# Altium PCB PowerCutMonitor-v1.0.PcbDoc (part 1 of 2)
Units mil, origin at the board's own origin, x right, y up, seen from the top; angles counter-clockwise.
Board outline 3267.72 x 1141.73 mil, 2 copper layers (Top Layer, Bottom Layer), stack 61.811 mil thick; 45 components, 28 nets, 151 pads, 51 vias.
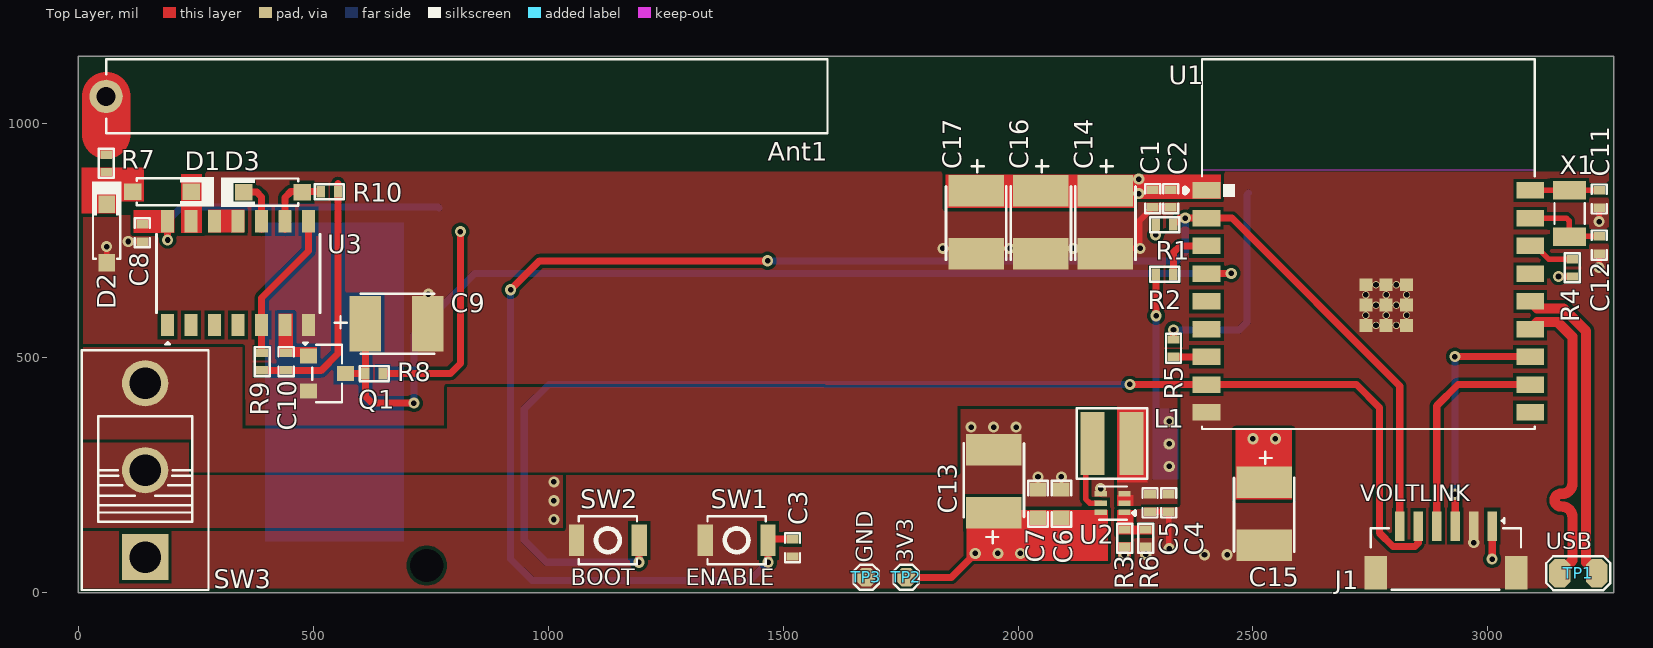
[diagram p0: Top Layer view]
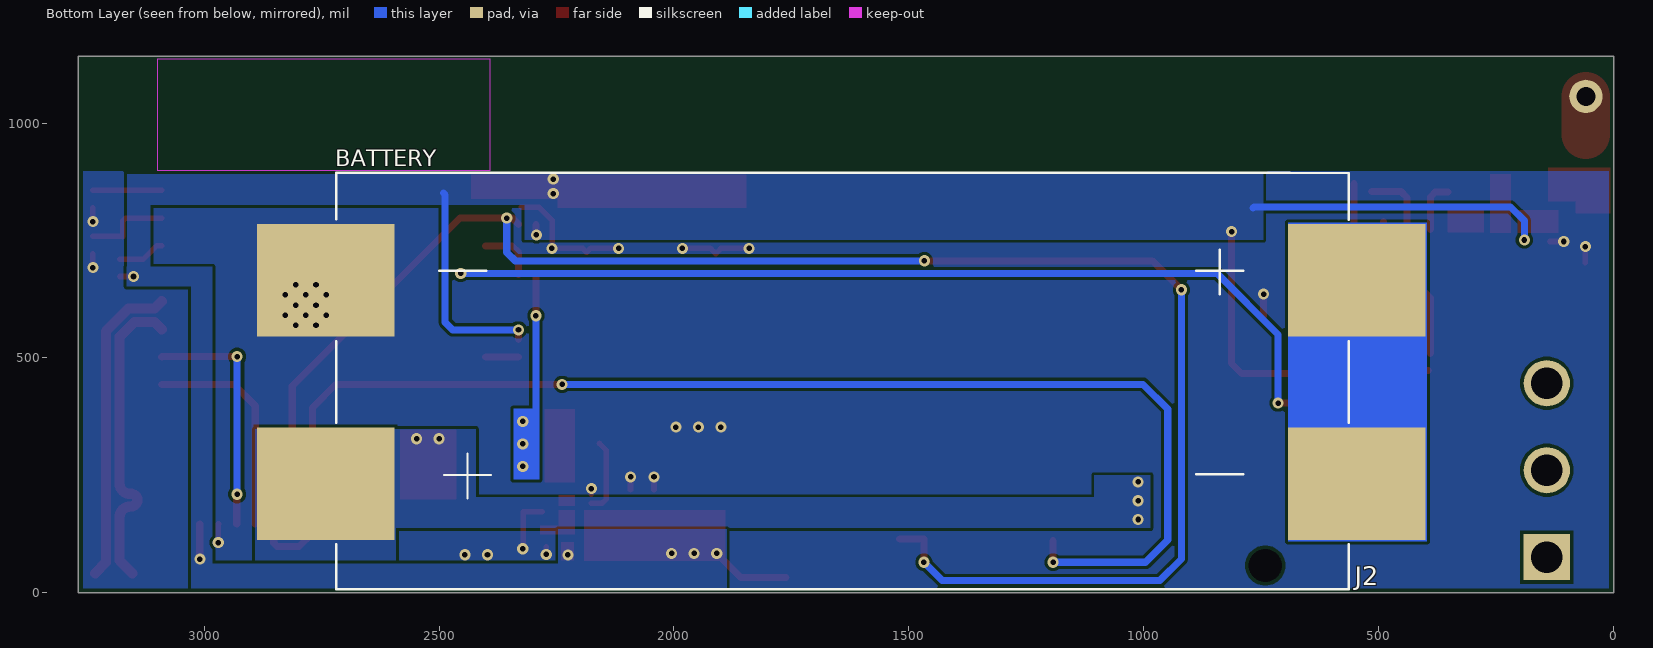
[diagram p1: Bottom Layer view, seen from below]
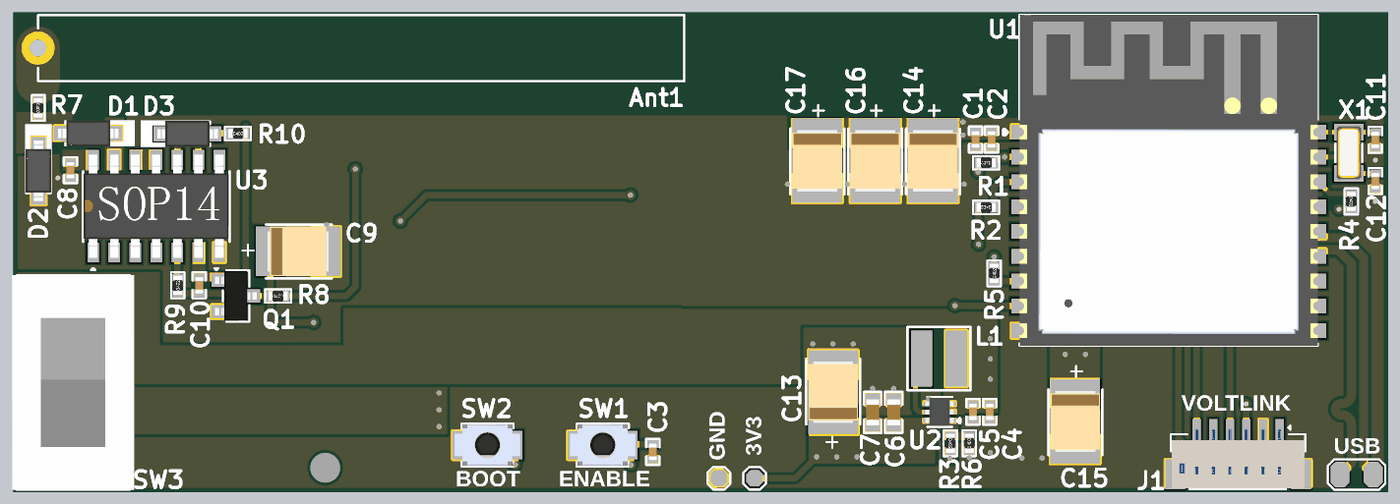
[diagram p2: 3D render of the assembled board from above, using the file's embedded part models]

## Layer stack, top to bottom
Top Solder: solder mask 0.394, Solder Resist, Dk 3.5
Top Layer: signal copper 1.378
Dielectric 1: dielectric 59.055, FR-4, Dk 4.8
Bottom Layer: signal copper 1.378
Bottom Solder: solder mask 0.394, Solder Resist, Dk 3.5

## Board outline
0,0 3267.72,0 3267.72,1141.73 0,1141.73

## Design rules (kind name [scope] priority, off if disabled: settings)
BoardOutlineClearance [All] p1: gap=0 ignorepadtopadclearanceinfootprint=FALSE except(10: Poly-OutlineEdge)
Clearance [All] p1: gap=7 ignorepadtopadclearanceinfootprint=FALSE except(0: Arc-Hole Track-Hole SMDPad-Hole THPad-Hole Via-Hole Fill-Hole Poly-Hole Region-Hole Text-Hole; 4: Arc-SMDPad Track-SMDPad SMDPad-SMDPad)
DiffPairsRouting [InDifferentialPair('USB_D')] p1: maxlimit=7 minlimit=7 mostfreqgap=7 toplayer_minwidth=22 toplayer_maxwidth=22 toplayer_prefwidth=22 bottomlayer_minwidth=22 bottomlayer_maxwidth=22 bottomlayer_prefwidth=22 impedanceprofiledriven=TRUE impedanceprofileid={5CDDB4C1-96F4-4CBD-ACC2-1FC4F32C532A} impedanceprofilevalue=90.000000 maxuncoupledlength=500
HoleSize [All] p1: absolutevalues=TRUE maxlimit=1000 minlimit=1 maxpercent=80.000 minpercent=20.000
HoleToHoleClearance [All] p1: gap=0 allowstackedmicrovias=TRUE
MinimumSolderMaskSliver [All] p1: minsoldermaskwidth=0
PolygonConnect [All] p1: connectstyle=Direct reliefconductorwidth=10 reliefentries=4 polygonreliefangle="90 Angle" airgapwidth=10
RoutingVias [All] p1: holewidth=11.81 width=23.62 viastyle="Through Hole" minholewidth=11.81 minwidth=23.62 maxholewidth=11.81 maxwidth=23.62
SilkToSilkClearance [All] p1: silktosilkclearance=0
SilkToSolderMaskClearance [IsPad] p1: minsilkscreentomaskgap=0 clearancetoexposedcopper=TRUE
SolderMaskExpansion [All] p1: expansion=4 istentingtop=FALSE
Width Width_RF [InNet('NetAnt1_1')] p1: maxlimit=103.77 minlimit=103.77 preferedwidth=103.77 impedanceprofiledriven=TRUE impedanceprofileid={25470196-0FB0-4DC4-8176-56BB9425A2A2} impedanceprofilevalue=50.000000 minimp=50.000000 maximp=50.000000 favimp=50.000000
Width [All] p2: maxlimit=100 minlimit=10 preferedwidth=22
24 further rules are at their usual default settings.

## Classes and differential pairs
net class USB_LINES: USB_D_N USB_D_P
differential pair USB_D: +USB_D_P -USB_D_N

## Components (designator, comment, footprint, x,y, rotation, side; value= is the part's Value field where it differs from the comment)
Ant1 "BW315SNX39-6W3" BW315SNX39-6W3 59,1056.73 r90 top
C1 "100nF" cap-0402 2287,839.23 r90 top
C2 "10uF" Cap-0402 2325,839.23 r90 top
C3 "1uF" Cap-0402 1520,95.73 r90 top
C4 "10uF" Cap-0402 2321,191.23 r90 top
C5 "10uF" Cap-0402 2281,191.23 r90 top
C6 "22uF" Cap-0603 2092.5,189.73 r270 top
C7 "22uF" Cap-0603 2042.5,189.73 r270 top
C8 "100nF" cap-0402 136,766.23 r90 top
C9 "33uF" Case-B 677,572.73 r0 top
C10 "2.2nF" Cap-0402 442,492.23 r90 top
C11 "15pF" Cap-0402 3237,838.23 r90 top
C12 "15pF" Cap-0402 3237,740.23 r90 top
C13 "100uF" Case-B 1948.5,237.66 r90 top
C14 "100uF" Case-B 2186,788.8 r270 top
C15 "100uF" Case-B 2524,168.07 r270 top
C16 "100uF" Case-B 2048.5,788.8 r270 top
C17 "100uF" Case-B 1911,788.8 r270 top
D1 "1N4148W-7-F" SOD-123 178,853.73 r0 top value=2pF
D2 "1N4148W-7-F" SOD-123 60,764.72 r90 top value=2pF
D3 "1N4148W-7-F" SOD-123 414.01,852.73 r180 top value=2pF
J1 "Voltlink Target" "Voltlink Target" 2911,92.37 r180 top
J2 "BH-AAA-B5AK001" BH-AAA-B5AK001 1644,448.73 r0 bottom
L1 "0.47uH" SPM3015-R47N 2200,317.73 r0 top
Q1 "BC847C,215" SOT-23 529,466.73 r270 top
R1 "10K" Res-0402 2312,783.73 r180 top
R2 "1K" Res-0402 2312,677.73 r180 top
R3 "453K" Res-0402 2227,116.23 r270 top
R4 "10K" Res-0402 3180,691.73 r270 top
R5 "10K" Res-0402 2331.04,520.69 r90 top
R6 "100K" Res-0402 2272,116.23 r90 top
R7 "1M" Res-0402 59,914.23 r270 top value=1MR
R8 "100K" Res-0402 629.5,466.73 r0 top
R9 "220K" Res-0402 391,492.23 r90 top
R10 "560K" Res-0402 534.02,853.73 r0 top
SW1 "B3U-1000P" B3U-1000P 1401.07,111.73 r180 top
SW2 "B3U-1000P" B3U-1000P 1127,111.73 r180 top
SW3 "SS-12D10L9" SS-12D10L9 142,261 r90 top
TP1 "2 Test Pad" "2 Test Pad" 3153.26,41.73 r0 top
TP2 "TEST POINT 0.5mm Dia" "Test-point - 0.5mm" 1762,33 r180 top
TP3 "TEST POINT 0.5mm Dia" "Test-point - 0.5mm" 1677,33 r180 top
U1 "ESP32-C3-WROOM-02-N4" ESP32-C3-WROOM-02-N4 2401.41,856.52 r0 top
U2 "TPS61023DRLR" SOT-563 2201.5,190.73 r180 top
U3 "CD4069" SOP-14 340,680.5 r90 top
X1 "Q13FC13500004" SMD3215-2P 3174,807.52 r270 top

## Footprints (in the part's own frame and the unit in brackets; to place one, negate y for a bottom-side part, rotate by r counter-clockwise, add the part's x,y. Pads: shape width x height; smd on the part's side, far side on the other; paste and mask are expansions set on the pad)
"2 Test Pad" [mil]
  oct 45x60 smd: 1(0,0) 2(78.74,0)
  silkscreen extent -29,-36 108,36
B3U-1000P [mm] "SWITCH TACTILE SPST-NO 0.05A 12V"
  rect 0.82x1.72 smd: 1(-1.7,0) 2(1.7,0)
  silkscreen extent -1.57,-1.3 1.57,1.3, body extent -2,-1.26 2,1.24, height 1.6
BH-AAA-B5AK001 [mm]
  rect 7.45x6.1 smd: 1(27.875,5.5) 2(-27.875,5.5) 3(-27.875,-5.5) 4(27.875,-5.5)
  round 0 hole 1.8 unplated: S39(-22.925,9.925)
  silkscreen extent -27.43,-11.31 27.31,11.2, body extent -31.1,-11.2 31.1,11.2, height 11.4
BW315SNX39-6W3 [mm]
  round 1.8 hole 1.02: 1(0,0)
  silkscreen extent -2,-39 2,0
cap-0402 [mil]
  rect 18x25 smd mask+2.36: 1(-18.5,0) 2(18.5,0)
  silkscreen extent -31,-16 31,16, body extent -20,-10 20,10, height 19
Cap-0402 [mil]
  rect 18x25 smd mask+2.36: 1(-18.5,0) 2(18.5,0)
  silkscreen extent -31,-16 31,16, body extent -20,-10 20,10, height 19
Cap-0603 [mil]
  rect 30x35 smd mask+2.36: 1(-30,0) 2(30,0)
  silkscreen extent -49,-21 49,21, body extent -32,-16 31,16, height 34
Case-B [mm]
  rect 1.7x3 smd paste+0: 1(-1.7,0) 2(1.7,0)
  silkscreen extent -3.35,-1.63 2.03,1.63, body extent -1.85,-1.5 1.85,1.5, height 2.16
ESP32-C3-WROOM-02-N4 [mm]
  rect 1.5x0.9 smd: 1(0,0) 2(0,-1.5) 3(0,-3) 4(0,-4.5) 5(0,-6) 6(0,-7.5) 7(0,-9) 8(0,-10.5) 9(0,-12) 10(17.5,-12) 11(17.5,-10.5) 12(17.5,-9) 13(17.5,-7.5) 14(17.5,-6) 15(17.5,-4.5) 16(17.5,-3) 17(17.5,-1.5) 18(17.5,0)
  rect 0.7x0.7 smd: 19(8.61,-5.1) 20(9.71,-5.1) 21(10.81,-5.1) 22(8.61,-6.2) 23(9.71,-6.2) 24(10.81,-6.2) 25(8.61,-7.3) 26(9.71,-7.3) 27(10.81,-7.3)
  round 0.4 hole 0.3 mask+0: 28(9.16,-5.1) 29(10.26,-5.1) 30(8.61,-5.65) 31(9.71,-5.65) 32(10.81,-5.65) 33(9.16,-6.2) 34(10.26,-6.2) 35(8.61,-6.75) 36(9.71,-6.75) 37(10.81,-6.75) 38(9.16,-7.3) 39(10.26,-7.3)
  Keep-Out Layer region: 17.75,1.1 -0.25,1.1 -0.25,7.1 17.75,7.1
  silkscreen extent -1.17,-12.9 17.75,7.1, body extent -0.25,-12.9 17.75,7.1, height 3.35
Res-0402 [mil]
  rect 18x25 smd mask+2.17: 1(-18.5,0) 2(18.5,0)
  silkscreen extent -32,-17 32,16, body extent -23,-11 23,11, height 16
SMD3215-2P [mm]
  rect 1x1.8 smd: 1(-1.25,0) 2(1.25,0)
  silkscreen extent -0.56,-0.81 0.56,0.81, body extent -1.6,-0.75 1.6,0.75, height 0.8
SOD-123 [mm]
  rect 0.95x0.9 smd: 1(-1.575,0) 2(1.575,0)
  silkscreen extent -1.37,-0.8 2.82,0.8, body extent -1.82,-0.78 1.83,0.78, height 1.5
SOP-14 [mm]
  rect 1.2x0.7 smd: 1(-2.8,3.81) 2(-2.8,2.54) 3(-2.8,1.27) 4(-2.8,0) 5(-2.8,-1.27) 6(-2.8,-2.54) 7(-2.8,-3.81) 8(2.8,-3.81) 9(2.8,-2.54) 10(2.8,-1.27) 11(2.8,0) 12(2.8,1.27) 13(2.8,2.54) 14(2.8,3.81)
  silkscreen extent -3.86,-4.42 2.1,4.42, body extent -3.12,-4.38 3.12,4.38, height 1.39
SOT-23 [mm] "TRANS NPN 40V 0.6A SOT23"
  rect 0.82x0.92 smd: 1(-0.95,-1) 2(0.95,-1) 3(0,1)
  silkscreen extent -1.68,-1.3 1.55,0.81, body extent -1.5,-1.25 1.5,1.25, height 1.05
SOT-563 [mm]
  rect 0.67x0.3 smd mask+0.07: 1(-0.638,0.5) 2(-0.638,0) 3(-0.638,-0.5) 4(0.638,-0.5) 5(0.638,0) 6(0.638,0.5)
  silkscreen extent -1.22,-0.9 0.74,0.9, body extent -0.85,-0.85 0.85,0.85, height 0.61
SPM3015-R47N [mm]
  rect 1.3x3.4 smd: 1(1.05,0) 2(-1.05,0)
  silkscreen extent -1.91,-1.91 1.9,1.91
SS-12D10L9 [mm]
  rect 2.5x2.5 hole 1.7 paste-2539.97 mask+0.051: 1(-4.7,0)
  round 2.5 hole 1.7 paste-2539.97 mask+0.051: 2(0,0) 3(4.7,0)
  silkscreen extent -6.48,-3.43 6.48,3.43, body extent -6.5,-3.7 6.5,3.7, height 16
"Test-point - 0.5mm" [mm]
  oct 1x1 smd: 1(0,0)
  silkscreen extent -0.68,-0.68 0.68,0.68
"Voltlink Target" [mm]
  rect 0.5x1.6 smd: 1(-2.5,-1.262) 2(-1.5,-1.262) 3(-0.5,-1.262) 4(0.5,-1.262) 5(1.5,-1.262) 6(2.5,-1.262)
  rect 1.2x1.8 smd: MP1(-3.8,1.262) MP2(3.8,1.262)
  silkscreen extent -4.06,-1.68 4.06,2.17, body extent -4,-1.49 4,2.11, height 4.25

## Part data
Ant1: "1.8 3dBi Vertical 50W Antennas ROHS", LCSC Part Number=C496553, Manufacturer="BAT WIRELESS", Package=Custom, ComponentLink1Description=LCSC, ComponentLink1URL=https://www.lcsc.com/product-detail/Antennas_BAT-WIRELESS-BW315SNX39-6W3_C496553.html, Item Type=Antenna, Manufacturer Part Number=BW315SNX39-6W3
C1 C8: library part C1005X7R1H104KT000F, "CAP CER 0.1UF 50V X7R 0402", Dielectric=X7R, LCSC Part Number=C361198, Manufacturer=TDK, Tolerance=10%, Voltage=25V, Category="Ceramic Capacitors", ComponentLink1Description=LCSC, ComponentLink1URL=https://www.lcsc.com/product-detail/Multilayer-Ceramic-Capacitors-MLCC-SMD-SMT_TDK-C1005X7R1H104KT000F_C361198.html, Item Type=Capacitor, Manufacturer Part Number=C1005X7R1H104KT000F, RoHS=No, Supplier 1=Avnet, Supplier Part Number 1=C1005X7R1H104KT000F
C2 C4 C5: library part CC0402MRX5R6BB106, "CAP CER 10UF 10V X5R 0402", Case Code (Imperial)=0402, Case Code (Metric)=1005, LCSC Part Number=C962143, Manufacturer=Yageo, Max Operating Temperature=85°C, Min Operating Temperature=-55°C, Supplier Part Number 1=6097631, Tolerance=20%, Voltage Rating=10V, Capacitance=10uF, Case/Package=0402, Category="Ceramic Capacitors", ComponentLink1Description=http://www.yageo.com/documents/recent/UPY-GPHC_X5R_4V-to-50V_25.pdf?src-supplier=Digi-Key, ComponentLink1URL=http://www.yageo.com/documents/recent/UPY-GPHC_X5R_4V-to-50V_25.pdf?src-supplier=Digi-Key, Item Type=Capacitor, Manufacturer Part Number=CC0402MRX5R6BB106, Mount="Surface Mount", Packaging="Tape and Reel", Pricing 1="10000=0.02650, 20000=0.02590, 30000=0.02550, 40000=0.02530, 50000=0.02450 (USD)", RoHS=Yes, RoHS Compliant=Yes, Stock 1=80000, Supplier 1="Future Electronics"
C3: library part CC0402KRX5R7BB105, "CAP CER 1UF 16V X5R 0402", Case Code (Imperial)=0402, Case Code (Metric)=1005, Dielectric=X5R, LCSC Part Number=C325464, Manufacturer=Yageo, Max Operating Temperature=85°C, Min Operating Temperature=-55°C, Supplier Part Number 1=311-1691-6-ND, Tolerance=10%, Voltage Rating=16V, Capacitance=1uF, Case/Package=0402, ComponentLink1Description=http://www.yageo.com/documents/recent/UPY-GPHC_X5R_4V-to-50V_12.pdf?src-supplier=Avnet+Europe, ComponentLink1URL=http://www.yageo.com/documents/recent/UPY-GPHC_X5R_4V-to-50V_12.pdf?src-supplier=Avnet+Europe, Composition=Ceramic, Depth=0.5mm, Halogen Free="Halogen Free", Height=0.5mm, Item Type=Capacitor, Lead Free="Lead Free", Length=1mm, Manufacturer Part Number=CC0402KRX5R7BB105, Mount="Surface Mount", Packaging="Tape and Reel", Pricing 1="1=0.36, 10=0.252, 100=0.1512, 500=0.1134, 1000=0.09576, 2500=0.09072, 5000=0.08568 (USD)", Radiation Hardening=No, Stock 1=1405667, Supplier 1=Digi-Key, Termination=SMD/SMT, Thickness=0.022inch, Voltage Rating (DC)=16V, Weight=2.3E-05oz, Width=0.02inch
C6 C7: library part CC0603MRX5R5BB226, "CAP CER 22UF 6.3V X5R 0603", Case Code (Imperial)=0603, Case Code (Metric)=1608, Dielectric=X5R, LCSC Part Number=C109448, Manufacturer=Yageo, Max Operating Temperature=85°C, Min Operating Temperature=-55°C, Package Quantity=4000, Resistor Type=Ceramic, Supplier Part Number 1=603-CC603MRX5R5BB226, Tolerance=20%, Voltage Rating=6.3V, Capacitance=22uF, Case/Package=0603, Category="Ceramic Capacitors", ComponentLink1Description=http://www.mouser.com/ds/2/447/Yageo_UPY-GP_NP0_16V-to-50V_9-358835.pdf?src-supplier=Mouser, ComponentLink1URL=http://www.mouser.com/ds/2/447/Yageo_UPY-GP_NP0_16V-to-50V_9-358835.pdf?src-supplier=Mouser, ComponentLink2Description=http://www.yageo.com/documents/recent/UPY-GPHC_X5R_4V-to-50V_25.pdf?src-supplier=Digi-Key, ComponentLink2URL=http://www.yageo.com/documents/recent/UPY-GPHC_X5R_4V-to-50V_25.pdf?src-supplier=Digi-Key, Depth=0.8mm, Halogen Free="Halogen Free", Lead Free="Lead Free", Length=0.063inch, Manufacturer Part Number=CC0603MRX5R5BB226, Mount="Surface Mount", Packaging="Tape and Reel", Pricing 1="1=0.33000, 10=0.22500, 50=0.22500, 100=0.12800, 1000=0.07900, 10000=0.06500 (USD)", RoHS=Yes, RoHS Compliant=Yes, Stock 1=3030, Supplier 1=Mouser, Termination=SMD/SMT, Thickness=0.035inch, Voltage Rating (DC)=6.3V, Weight=7.1E-05oz, Width=0.031inch
C9: library part TAJB336K010RNJ, "CAP TANT 33UF 10% 10V 1411", Case Code (Imperial)=1210, Case Code (Metric)=3528, Dielectric Material=Tantalum, ESR (Equivalent Series Resistance)=1.8R, LCSC Part Number=C7202, Leakage Current=3.3uA, Manufacturer="Kyocera AVX", Max Operating Temperature=125°C, Min Operating Temperature=-55°C, Package Quantity=1, Supplier Part Number 1=1364604P, Tolerance=10%, Voltage=10V, Case/Package=1210, Category="Tantalum Capacitors", ComponentLink1Description=https://datasheet.ciiva.com/26341/559435-da-01-en-tacc-b-3-2-mm-x-2-5-mm-x-1-9-mm-33-uf-26341776.pdf?src-supplier=Conrad, ComponentLink1URL=https://datasheet.ciiva.com/26341/559435-da-01-en-tacc-b-3-2-mm-x-2-5-mm-x-1-9-mm-33-uf-26341776.pdf?src-supplier=Conrad, ComponentLink2Description=https://datasheet.ciiva.com/7775/49917-7775706.pdf?src-supplier=Element14, ComponentLink2URL=https://datasheet.ciiva.com/7775/49917-7775706.pdf?src-supplier=Element14, ComponentLink3Description=https://datasheet.ciiva.com/7775/49917-7775705.pdf?src-supplier=Element14, ComponentLink3URL=https://datasheet.ciiva.com/7775/49917-7775705.pdf?src-supplier=Element14, ComponentLink4Description=https://datasheet.ciiva.com/7775/1680476-7775704.pdf?src-supplier=Element14, ComponentLink4URL=https://datasheet.ciiva.com/7775/1680476-7775704.pdf?src-supplier=Element14, ComponentLink5Description=https://datasheet.ciiva.com/264/taj-264134.pdf?src-supplier=Digi-Key, ComponentLink5URL=https://datasheet.ciiva.com/264/taj-264134.pdf?src-supplier=Digi-Key, ComponentLink6Description=https://datasheet.ciiva.com/264/taj-264133.pdf?src-supplier=Digi-Key, ComponentLink6URL=https://datasheet.ciiva.com/264/taj-264133.pdf?src-supplier=Digi-Key, ComponentLink7Description=https://datasheet.ciiva.com/264/taj-264135.pdf?src-supplier=Digi-Key, ComponentLink7URL=https://datasheet.ciiva.com/264/taj-264135.pdf?src-supplier=Digi-Key, ComponentLink8Description=https://datasheet.ciiva.com/12884/taj-27497-12884279.pdf?src-supplier=Mouser, ComponentLink8URL=https://datasheet.ciiva.com/12884/taj-27497-12884279.pdf?src-supplier=Mouser, ComponentLink9Description=https://datasheet.ciiva.com/14590/70001050-14590215.pdf?src-supplier=Allied+Electronics, ComponentLink9URL=https://datasheet.ciiva.com/14590/70001050-14590215.pdf?src-supplier=Allied+Electronics, ComponentLink10Description=https://datasheet.ciiva.com/14592/70001050-14592670.pdf?src-supplier=Allied+Electronics, ComponentLink10URL=https://datasheet.ciiva.com/14592/70001050-14592670.pdf?src-supplier=Allied+Electronics, ComponentLink11Description=https://datasheet.ciiva.com/11224/taj-11224937.pdf?src-supplier=Avnet, ComponentLink11URL=https://datasheet.ciiva.com/11224/taj-11224937.pdf?src-supplier=Avnet, ComponentLink12Description=https://datasheet.ciiva.com/16492/taj-16492863.pdf?src-supplier=Future+Electronics, ComponentLink12URL=https://datasheet.ciiva.com/16492/taj-16492863.pdf?src-supplier=Future+Electronics, ComponentLink13Description=https://datasheet.ciiva.com/11224/taj-11224941.pdf?src-supplier=Avnet, ComponentLink13URL=https://datasheet.ciiva.com/11224/taj-11224941.pdf?src-supplier=Avnet, Construction=Flat, Depth=2.8mm, Dissipation Factor=6%, Features="General Purpose", Height=1.9mm, Height - Seated (Max)=0.083inch, Item Type=Capacitor, Lead Free="Lead Free", Lead Pitch=1.4mm, Length=3.5mm, Manufacturer Part Number=TAJB336K010RNJ, Mounting Technology="Surface Mount,PCB", Packaging="Tape and Reel", Pins=2, Polarity=Polar, Pricing 1="100=0.01410, 400=0.24800, 1000=0.21600 (GBP)", Radiation Hardening=No, Reach SVHC Compliant=Yes, RoHS=Yes, RoHS Compliant=Yes, Series=TAJ, Stock 1=1580, Supplier 1=Rs, Termination=SMD/SMT, Voltage Rating=10V, Voltage Rating (DC)=10V, Width=2.8mm
C10: library part 04025C222JAT2A, "CAP CER 2.2nF 50V X7R ±5% 0402 MLCC - SMD/SMT ROHS", LCSC Part Number=C597041, Manufacturer="Kyocera AVX", Package=0402, ComponentLink1Description=LCSC, ComponentLink1URL=https://www.lcsc.com/product-detail/Multilayer-Ceramic-Capacitors-MLCC-SMD-SMT_Kyocera-AVX-04025C222JAT2A_C597041.html, Item Type=Capacitor, Manufacturer Part Number=04025C222JAT2A
C11 C12: library part CQ0402GRNPO9BN150, "CAP CER 15PF 50V C0G/NPO 0402", Case Code (Imperial)=0402, Case Code (Metric)=1005, Dielectric=C0G, LCSC Part Number=C577406, Manufacturer=Yageo, Max Operating Temperature=125°C, Min Operating Temperature=-55°C, Package Quantity=10000, Tolerance=2%, Voltage Rating=50V, Case/Package=0402, ComponentLink1Description=http://www.mouser.com/ds/2/447/UPY-High%20Q_NP0_16V-to-250V_11-533944.pdf?src-supplier=Mouser, ComponentLink1URL=http://www.mouser.com/ds/2/447/UPY-High%20Q_NP0_16V-to-250V_11-533944.pdf?src-supplier=Mouser, ComponentLink2Description=http://www.yageo.com/documents/recent/UPY-High%20Q_NP0_16V-to-250V_13.pdf?src-supplier=Digikey, ComponentLink2URL=http://www.yageo.com/documents/recent/UPY-High%20Q_NP0_16V-to-250V_13.pdf?src-supplier=Digikey, Item Type=Capacitors, Manufacturer Part Number=CQ0402GRNPO9BN150, Mounting Technology="Surface Mount", Packaging="Tape and Reel", Pricing="10000=0.04366 (USD)", RoHS=Yes, Series=CQ, Supplier=Digikey, Voltage Rating (DC)=50V, Weight=2.3E-05oz
C13 C14 C15 C16 C17: library part TPSB107M006R0250, "CAP TANT 100UF 20% 6.3V 1411", LCSC Part Number=C283239, Manufacturer="Kyocera AVX", ComponentLink1Description=https://datasheet.ciiva.com/16501/tps-16501597.pdf?src-supplier=Future+Electronics, ComponentLink1URL=https://datasheet.ciiva.com/16501/tps-16501597.pdf?src-supplier=Future+Electronics, ComponentLink2Description=https://datasheet.ciiva.com/3004/tps-3004598.pdf?src-supplier=Avnet, ComponentLink2URL=https://datasheet.ciiva.com/3004/tps-3004598.pdf?src-supplier=Avnet, ComponentLink3Description=https://datasheet.ciiva.com/264/tps-264115.pdf?src-supplier=Digikey, ComponentLink3URL=https://datasheet.ciiva.com/264/tps-264115.pdf?src-supplier=Digikey, ComponentLink4Description=https://datasheet.ciiva.com/264/tps-264116.pdf?src-supplier=Digikey, ComponentLink4URL=https://datasheet.ciiva.com/264/tps-264116.pdf?src-supplier=Digikey, ComponentLink5Description=https://datasheet.ciiva.com/264/tps-264117.pdf?src-supplier=Digikey, ComponentLink5URL=https://datasheet.ciiva.com/264/tps-264117.pdf?src-supplier=Digikey, Item Type="Tantalum Capacitors", Manufacturer Part Number=TPSB107M006R0250, Pricing="1=0.8, 10=0.504, 50=0.3874, 100=0.3515, 500=0.29072, 1000=0.27195 (USD)", RoHS=Yes, Stock=19045, Supplier=Digikey
D1 D2 D3: "DIODE GEN PURP 100V 300MA SOD123", Average Rectified Current=300mA, Current Rating=150mA, Forward Voltage=1.25V, LCSC Part Number=C83528, Manufacturer=Diodes, Max Forward Surge Current (Ifsm)=2A, Max Operating Temperature=150°C, Max Repetitive Reverse Voltage (Vrrm)=100V, Max Reverse Current=1uA, Min Operating Temperature=-65°C, Package Quantity=3000, Power Dissipation=400mW, Supplier Part Number 1=7634694, Voltage Rating (DC)=75V, Category="Rectifier Diodes", ComponentLink1Description=https://datasheet.ciiva.com/1179/1915529-1179304.pdf?src-supplier=Element14, ComponentLink1URL=https://datasheet.ciiva.com/1179/1915529-1179304.pdf?src-supplier=Element14, ComponentLink2Description=https://datasheet.ciiva.com/22695/1915529-22695239.pdf?src-supplier=Element14, ComponentLink2URL=https://datasheet.ciiva.com/22695/1915529-22695239.pdf?src-supplier=Element14, ComponentLink3Description=https://datasheet.ciiva.com/8300/ds30086-8300392.pdf?src-supplier=Avnet, ComponentLink3URL=https://datasheet.ciiva.com/8300/ds30086-8300392.pdf?src-supplier=Avnet, ComponentLink4Description=https://datasheet.ciiva.com/15219/getdatasheetpartid-110030-15219548.pdf?src-supplier=Verical, ComponentLink4URL=https://datasheet.ciiva.com/15219/getdatasheetpartid-110030-15219548.pdf?src-supplier=Verical, ComponentLink5Description=https://datasheet.ciiva.com/8303/ds30086-8303197.pdf?src-supplier=Avnet, ComponentLink5URL=https://datasheet.ciiva.com/8303/ds30086-8303197.pdf?src-supplier=Avnet, ComponentLink6Description=https://datasheet.ciiva.com/911/ds30086-911735.pdf?src-supplier=Digi-Key, ComponentLink6URL=https://datasheet.ciiva.com/911/ds30086-911735.pdf?src-supplier=Digi-Key, ComponentLink7Description=https://datasheet.ciiva.com/911/ds30086-911736.pdf?src-supplier=Digi-Key, ComponentLink7URL=https://datasheet.ciiva.com/911/ds30086-911736.pdf?src-supplier=Digi-Key, ComponentLink8Description=https://datasheet.ciiva.com/911/ds30086-911734.pdf?src-supplier=Digi-Key, ComponentLink8URL=https://datasheet.ciiva.com/911/ds30086-911734.pdf?src-supplier=Digi-Key, ComponentLink9Description=https://datasheet.ciiva.com/4435/ds30086-4435128.pdf?src-supplier=Mouser, ComponentLink9URL=https://datasheet.ciiva.com/4435/ds30086-4435128.pdf?src-supplier=Mouser, Contact Plating=Tin,Matte, Element Configuration=Single, Forward Current=150mA, Height=1.25mm, Item Type=Diode, Lead Free="Lead Free", Length=2.85mm, Manufacturer Part Number=1N4148W-7-F, Max Reverse Voltage (DC)=100V, Max Surge Current=2A, Mounting Technology="Surface Mount", Output Current=150mA, Packaging="Tape and Reel", Peak Non-Repetitive Surge Current=2A, Pins=2, Polarity=Standard, Power Rating=400mW, Pricing 1="3000=0.01840, 12000=0.01760, 45000=0.01690, 120000=0.01640, 300000=0.01560 (USD)", Radiation Hardening=No, Reach SVHC Compliant=Yes, Recovery Time=4ns, Reverse Recovery Time=4ns, Reverse Recovery Time-Max=4ns, RoHS=Yes, RoHS Compliant=Yes, Series=-, Stock 1=32931000, Supplier 1="Future Electronics", Voltage=100V, Weight=0.000353oz, Width=1.7mm
J1: library part C145963, "1x6P SH 1 1mm 6 SMD,P=1mm Wire To Board / Wire To Wire Connector ROHS", Manufacturer=BOOMELE, Package=SMD,P=1mm, ComponentLink1Description=LCSC, ComponentLink1URL=https://www.lcsc.com/product-detail/Wire-To-Board-Wire-To-Wire-Connector_BOOMELE-Boom-Precision-Elec-C145963_C145963.html, Item Type=Connector, LCSC Part Number=C145963, Manufacturer Part Number=C145963
J2: "Battery box Tin -25℃~+85℃ Phosphor Bronze No. 7 SMD Button And Strip Battery Connector ROHS", LCSC Part Number=C964882, Manufacturer=MYOUNG, Package=SMD, ComponentLink1Description=LCSC, ComponentLink1URL=https://www.lcsc.com/product-detail/Button-And-Strip-Battery-Connector_MYOUNG-BH-AAA-B5AK001_C964882.html, Item Type="Battery Holder", Manufacturer Part Number=BH-AAA-B5AK001
L1: library part SPM3015-R47N, "3.7A 0.47uH ±30% 6A 1212 Power Inductors ROHS", LCSC Part Number=C2761886, Manufacturer=KOHERelec, Package=1212, ComponentLink1Description=LCSC, ComponentLink1URL=https://www.lcsc.com/product-detail/Power-Inductors_KOHERelec-SPM3015-R47N_C2761886.html?s_z=n_744383350047, Item Type=Inductor, Manufacturer Part Number=SPM3015-R47N
Q1: "TRANS NPN 45V 0.1A TO-236AB", LCSC Part Number=C8664, Manufacturer=Nexperia, ComponentLink1Description=http://www.farnell.com/datasheets/1856333.pdf?src-supplier=Farnell, ComponentLink1URL=http://www.farnell.com/datasheets/1856333.pdf?src-supplier=Farnell, ComponentLink2Description=https://assets.nexperia.com/documents/data-sheet/BC847_SER.pdf?src-supplier=Digikey, ComponentLink2URL=https://assets.nexperia.com/documents/data-sheet/BC847_SER.pdf?src-supplier=Digikey, ComponentLink3Description=https://datasheet.octopart.com/BC847C%2C215-NXP-Semiconductors-datasheet-20734447.pdf?src-supplier=Farnell, ComponentLink3URL=https://datasheet.octopart.com/BC847C%2C215-NXP-Semiconductors-datasheet-20734447.pdf?src-supplier=Farnell, ComponentLink4Description=https://datasheet.octopart.com/BC847C%2C215-Nexperia-datasheet-164345412.pdf?src-supplier=Future+Electronics, ComponentLink4URL=https://datasheet.octopart.com/BC847C%2C215-Nexperia-datasheet-164345412.pdf?src-supplier=Future+Electronics, ComponentLink5Description=https://datasheet.octopart.com/BC847C%2C215-Nexperia-datasheet-11982477.pdf?src-supplier=Newark, ComponentLink5URL=https://datasheet.octopart.com/BC847C%2C215-Nexperia-datasheet-11982477.pdf?src-supplier=Newark, ComponentLink6Description=https://datasheet.octopart.com/BC847C%2C215-Nexperia-datasheet-5341283.pdf?src-supplier=TME, ComponentLink6URL=https://datasheet.octopart.com/BC847C%2C215-Nexperia-datasheet-5341283.pdf?src-supplier=TME, Item Type=BJTs, Manufacturer Part Number=BC847C,215, Packaging=13Packaging, Pins=3NUMBER, Polarity=5054Direction, Pricing="3000=0.0084, 12000=0.0081, 30000=0.0079, 75000=0.0077, 120000=0.0074 (USD)", RoHS=Yes, RoHS Compliant=Yes, Stock=18000, Supplier="Future Electronics"
R1 R4 R5: library part RC0402FR-0710KL, "RES 10K OHM 1% 1/16W 0402", Case Code (Imperial)=0402, Case Code (Metric)=1005, LCSC Part Number=C60490, Manufacturer=Yageo, Max Operating Temperature=155°C, Max Power Dissipation=63mW, Min Operating Temperature=-55°C, Power Rating=62.5mW, Resistance=10kR, Resistance Tolerance=1%, Resistor Type="Thick Film", Supplier Part Number 1=603-RC0402FR-0710KL, Temperature Coefficient=100ppm/°C, Voltage Rating=50V, Case/Package=0402, Category="Chip SMD Resistors", ComponentLink1Description=https://datasheet.ciiva.com/7660/38568-7660787.pdf?src-supplier=Element14, ComponentLink1URL=https://datasheet.ciiva.com/7660/38568-7660787.pdf?src-supplier=Element14, ComponentLink2Description=https://datasheet.ciiva.com/7849/1686128-7849814.pdf?src-supplier=Element14, ComponentLink2URL=https://datasheet.ciiva.com/7849/1686128-7849814.pdf?src-supplier=Element14, ComponentLink3Description=https://datasheet.ciiva.com/7983/1018594-7983486.pdf?src-supplier=Element14, ComponentLink3URL=https://datasheet.ciiva.com/7983/1018594-7983486.pdf?src-supplier=Element14, ComponentLink4Description=https://datasheet.ciiva.com/22747/1018594-22747512.pdf?src-supplier=Element14, ComponentLink4URL=https://datasheet.ciiva.com/22747/1018594-22747512.pdf?src-supplier=Element14, ComponentLink5Description=https://datasheet.ciiva.com/12667/pyu-rc0402-51-rohs-l-6-r-12667067.pdf?src-supplier=Mouser, ComponentLink5URL=https://datasheet.ciiva.com/12667/pyu-rc0402-51-rohs-l-6-r-12667067.pdf?src-supplier=Mouser, ComponentLink6Description=https://datasheet.ciiva.com/7849/1784430-7849813.pdf?src-supplier=Element14, ComponentLink6URL=https://datasheet.ciiva.com/7849/1784430-7849813.pdf?src-supplier=Element14, ComponentLink7Description=https://datasheet.ciiva.com/7849/1784430-7849815.pdf?src-supplier=Element14, ComponentLink7URL=https://datasheet.ciiva.com/7849/1784430-7849815.pdf?src-supplier=Element14, Construction=Rectangular, Depth=0.5mm, Features="Moisture Resistant", Height=0.32mm, Item Type=Resistor, Lead Free="Lead Free", Lead Pitch=0.2mm, Length=1mm, Manufacturer Part Number=RC0402FR-0710KL, Military Standard=Not, Number of Pins=2, Number of Terminations=2, Packaging="Tape and Reel", Pricing 1="1=0.10000, 10=0.01400, 50=0.01400, 100=0.00500, 1000=0.00300, 10000=0.00200 (USD)", REACH SVHC="No SVHC", RoHS=Yes, RoHS Compliant=Yes, Series=RC, Stock 1=18648329, Supplier 1=Mouser, Termination=SMD/SMT, Tolerance=1%, Voltage Rating (DC)=50V, Width=0.5mm, Working Voltage=50V
R2: library part RC0402FR-071KL, "RES 1K OHM 1% 1/16W 0402", Case Code (Imperial)=0402, Case Code (Metric)=1005, LCSC Part Number=C106235, Manufacturer=Yageo, Max Operating Temperature=155°C, Max Power Dissipation=63mW, Min Operating Temperature=-55°C, Power Rating=62.5mW, Resistance=1kR, Resistance Tolerance=1%, Resistor Type="Thick Film", Temperature Coefficient=100ppm/°C, Voltage Rating=50V, Case/Package=0402, Category="Chip SMD Resistors", ComponentLink1Description=https://datasheet.ciiva.com/11819/0900766b80c66297-11819477.pdf?src-supplier=RSComponents, ComponentLink1URL=https://datasheet.ciiva.com/11819/0900766b80c66297-11819477.pdf?src-supplier=RSComponents, ComponentLink2Description=https://datasheet.ciiva.com/7983/1018594-7983502.pdf?src-supplier=Element14, ComponentLink2URL=https://datasheet.ciiva.com/7983/1018594-7983502.pdf?src-supplier=Element14, ComponentLink3Description=https://datasheet.ciiva.com/22747/1018594-22747513.pdf?src-supplier=Element14, ComponentLink3URL=https://datasheet.ciiva.com/22747/1018594-22747513.pdf?src-supplier=Element14, ComponentLink4Description=https://datasheet.ciiva.com/12666/pyu-rc0402-51-rohs-l-6-r-12666741.pdf?src-supplier=Mouser, ComponentLink4URL=https://datasheet.ciiva.com/12666/pyu-rc0402-51-rohs-l-6-r-12666741.pdf?src-supplier=Mouser, ComponentLink5Description=https://datasheet.ciiva.com/7849/1018594-7849869.pdf?src-supplier=Element14, ComponentLink5URL=https://datasheet.ciiva.com/7849/1018594-7849869.pdf?src-supplier=Element14, ComponentLink6Description=https://datasheet.ciiva.com/7849/1018594-7849871.pdf?src-supplier=Element14, ComponentLink6URL=https://datasheet.ciiva.com/7849/1018594-7849871.pdf?src-supplier=Element14, ComponentLink7Description=https://datasheet.ciiva.com/17063/pyu-rc0402-51-rohs-l-6-r-17063193.pdf?src-supplier=Future+Electronics, ComponentLink7URL=https://datasheet.ciiva.com/17063/pyu-rc0402-51-rohs-l-6-r-17063193.pdf?src-supplier=Future+Electronics, Construction=Rectangular, Depth=0.5mm, Features="Moisture Resistant", Height=0.32mm, Item Type=Resistor, Lead Free="Lead Free", Length=1mm, Manufacturer Part Number=RC0402FR-071KL, Military Standard=Not, Number of Pins=2, Number of Terminations=2, Packaging="Tape and Reel", Pricing 1="10000=0.00085, 20000=0.00087, 40000=0.00084, 60000=0.00083, 80000=0.00079, 100000=0.00078, 1000000=0.00076 (USD)", Reach SVHC Compliant=Yes, RoHS=Yes, RoHS Compliant=Yes, Series=RC, Size Code=0402, Stock 1=13030000, Supplier 1=Avnet, Supplier Part Number 1=RC0402FR-071KL, Technology="THICK FILM", Termination=SMD/SMT, Tolerance=1%, Voltage Rating (DC)=50V, Width=0.5mm
R3: library part RC0402FR-07453KL, "RES 453K OHM 1% 1/16W 0402", LCSC Part Number=C137978, Manufacturer=Yageo, Voltage Rating (DC)=50V, ComponentLink1Description=https://datasheet.ciiva.com/8885/pyu-rc0402-51-rohs-l-6-8885671.pdf?src-supplier=Avnet, ComponentLink1URL=https://datasheet.ciiva.com/8885/pyu-rc0402-51-rohs-l-6-8885671.pdf?src-supplier=Avnet, ComponentLink2Description=https://datasheet.ciiva.com/26830/getdatasheetpartid-325135-26830117.pdf?src-supplier=Verical, ComponentLink2URL=https://datasheet.ciiva.com/26830/getdatasheetpartid-325135-26830117.pdf?src-supplier=Verical, ComponentLink3Description=https://datasheet.ciiva.com/17086/pyu-rc0402-51-rohs-l-6-r-17086533.pdf?src-supplier=Future+Electronics, ComponentLink3URL=https://datasheet.ciiva.com/17086/pyu-rc0402-51-rohs-l-6-r-17086533.pdf?src-supplier=Future+Electronics, Item Type=Resistors, Lead Free=5697LeadFree, Manufacturer Part Number=RC0402FR-07453KL, Pricing="1=0.1, 10=0.007, 100=0.0051, 1000=0.00408, 2500=0.00306 (USD)", RoHS=Yes, Stock=42641, Supplier=Digikey
R6 R8: library part RC0402FR-07100KL, "RES 100K OHM 1% 1/16W 0402", Case Code (Imperial)=0402, Case Code (Metric)=1005, LCSC Part Number=C60491, Manufacturer=Yageo, Max Operating Temperature=155°C, Max Power Dissipation=63mW, Min Operating Temperature=-55°C, Package Quantity=1, Resistance=100kR, Resistance Tolerance=1%, Resistor Type="Thick Film", Supplier Part Number 1=603-RC0402FR-07100KL, Temperature Coefficient=100ppm/°C, Voltage Rating=50V, Case/Package=0402, Category="Chip SMD Resistors", ComponentLink1Description=https://datasheet.ciiva.com/11819/0900766b80c66297-11819452.pdf?src-supplier=RSComponents, ComponentLink1URL=https://datasheet.ciiva.com/11819/0900766b80c66297-11819452.pdf?src-supplier=RSComponents, ComponentLink2Description=https://datasheet.ciiva.com/22747/1018594-22747509.pdf?src-supplier=Element14, ComponentLink2URL=https://datasheet.ciiva.com/22747/1018594-22747509.pdf?src-supplier=Element14, ComponentLink3Description=https://datasheet.ciiva.com/2453/pyu-r-int-thick-7-2453362.pdf?src-supplier=Digi-Key, ComponentLink3URL=https://datasheet.ciiva.com/2453/pyu-r-int-thick-7-2453362.pdf?src-supplier=Digi-Key, ComponentLink4Description=https://datasheet.ciiva.com/2453/pyu-r-int-thick-7-2453363.pdf?src-supplier=Digi-Key, ComponentLink4URL=https://datasheet.ciiva.com/2453/pyu-r-int-thick-7-2453363.pdf?src-supplier=Digi-Key, ComponentLink5Description=https://datasheet.ciiva.com/2453/pyu-r-int-thick-7-2453361.pdf?src-supplier=Digi-Key, ComponentLink5URL=https://datasheet.ciiva.com/2453/pyu-r-int-thick-7-2453361.pdf?src-supplier=Digi-Key, ComponentLink6Description=https://datasheet.ciiva.com/12667/pyu-rc0402-51-rohs-l-6-r-12667930.pdf?src-supplier=Mouser, ComponentLink6URL=https://datasheet.ciiva.com/12667/pyu-rc0402-51-rohs-l-6-r-12667930.pdf?src-supplier=Mouser, ComponentLink7Description=https://datasheet.ciiva.com/15189/getdatasheetpartid-323696-15189334.pdf?src-supplier=Verical, ComponentLink7URL=https://datasheet.ciiva.com/15189/getdatasheetpartid-323696-15189334.pdf?src-supplier=Verical, Construction=Rectangular, Depth=0.5mm, Features="Moisture Resistant", Height=0.016inch, Item Type=Resistor, Lead Free="Lead Free", Length=0.039inch, Manufacturer Part Number=RC0402FR-07100KL, Military Standard=Not, Number of Terminations=2, Packaging="Tape and Reel", Power Rating=63mW, Pricing 1="1=0.10000, 10=0.01200, 50=0.01200, 100=0.00500, 1000=0.00300, 2500=0.00200, 10000=0.00100 (USD)", REACH SVHC="No SVHC", RoHS=Yes, RoHS Compliant=Yes, Series=RC, Stock 1=7759549, Supplier 1=Mouser, Technology="THICK FILM", Termination=SMD/SMT, Tolerance=1%, Width=0.02inch, Working Voltage=50V
R7: library part RC0402FR-071ML, "RES 1M OHM 1% 1/16W 0402", Case Code (Imperial)=0402, Case Code (Metric)=1005, LCSC Part Number=C138033, Manufacturer=Yageo, Max Operating Temperature=155°C, Max Power Dissipation=63mW, Min Operating Temperature=-55°C, Resistance Tolerance=1%, Resistor Type="Thick Film", Supplier Part Number=311-1.00MLRCT-ND, Temperature Coefficient=100ppm/°C, Voltage Rating=50V, Case/Package=0402, Category="Chip SMD Resistors", ComponentLink1Description=https://datasheet.ciiva.com/11808/0900766b80c66297-11808125.pdf?src-supplier=Rs, ComponentLink1URL=https://datasheet.ciiva.com/11808/0900766b80c66297-11808125.pdf?src-supplier=Rs, ComponentLink2Description=https://datasheet.ciiva.com/46394/1018594-46394951.pdf?src-supplier=Element14, ComponentLink2URL=https://datasheet.ciiva.com/46394/1018594-46394951.pdf?src-supplier=Element14, ComponentLink3Description=https://datasheet.ciiva.com/7849/1018594-7849883.pdf?src-supplier=Element14, ComponentLink3URL=https://datasheet.ciiva.com/7849/1018594-7849883.pdf?src-supplier=Element14, ComponentLink4Description=https://datasheet.ciiva.com/7849/1018594-7849882.pdf?src-supplier=Element14, ComponentLink4URL=https://datasheet.ciiva.com/7849/1018594-7849882.pdf?src-supplier=Element14, ComponentLink5Description=https://datasheet.ciiva.com/16741/pyu-rc0402-51-rohs-l-6-r-16741081.pdf?src-supplier=Future+Electronics, ComponentLink5URL=https://datasheet.ciiva.com/16741/pyu-rc0402-51-rohs-l-6-r-16741081.pdf?src-supplier=Future+Electronics, Construction=Rectangular, Depth=0.5mm, Features="Moisture Resistant", Height=0.32mm, Item Type=Resistor, Lead Free=5697LeadFree, Length=1mm, Manufacturer Part Number=RC0402FR-071ML, Military Standard=Not, Number of Terminations=2, Packaging="Tape and Reel", Power Rating=63mW, Pricing="1=0.1, 10=0.015, 50=0.0088, 100=0.0073, 500=0.00488, 1000=0.00417, 5000=0.00297 (USD)", Reach SVHC Compliant=Unknown, RoHS=Yes, RoHS Compliant=Yes, Series=RC, Stock=6516, Supplier=Digikey, Technology="THICK FILM", Termination=SMD/SMT, Tolerance=1%, Voltage Rating (AC)=50V
R9: library part RC0402FR-07220KL, "RES 220K OHM 1% 1/16W 0402", Case Code (Imperial)=0402, Case Code (Metric)=1005, LCSC Part Number=C138030, Manufacturer=Yageo, Max Operating Temperature=155°C, Max Power Dissipation=63mW, Min Operating Temperature=-55°C, Package Quantity=1, Power Rating=62.5mW, Resistance=220kR, Resistance Tolerance=1%, Resistor Type="Thick Film", Temperature Coefficient=100ppm/°C, Voltage Rating=50V, Case/Package=0402, Category="Chip SMD Resistors", ComponentLink1Description=https://datasheet.ciiva.com/11808/0900766b80c66297-11808792.pdf?src-supplier=RSComponents, ComponentLink1URL=https://datasheet.ciiva.com/11808/0900766b80c66297-11808792.pdf?src-supplier=RSComponents, ComponentLink2Description=https://datasheet.ciiva.com/5924/1018594-5924944.pdf?src-supplier=Farnell, ComponentLink2URL=https://datasheet.ciiva.com/5924/1018594-5924944.pdf?src-supplier=Farnell, ComponentLink3Description=https://datasheet.ciiva.com/2453/pyu-r-int-thick-7-2453533.pdf?src-supplier=Digi-Key, ComponentLink3URL=https://datasheet.ciiva.com/2453/pyu-r-int-thick-7-2453533.pdf?src-supplier=Digi-Key, ComponentLink4Description=https://datasheet.ciiva.com/2453/pyu-r-int-thick-7-2453534.pdf?src-supplier=Digi-Key, ComponentLink4URL=https://datasheet.ciiva.com/2453/pyu-r-int-thick-7-2453534.pdf?src-supplier=Digi-Key, ComponentLink5Description=https://datasheet.ciiva.com/2453/pyu-r-int-thick-7-2453532.pdf?src-supplier=Digi-Key, ComponentLink5URL=https://datasheet.ciiva.com/2453/pyu-r-int-thick-7-2453532.pdf?src-supplier=Digi-Key, ComponentLink6Description=https://datasheet.ciiva.com/12577/pyu-rc0402-51-rohs-l-6-r-12577270.pdf?src-supplier=Mouser, ComponentLink6URL=https://datasheet.ciiva.com/12577/pyu-rc0402-51-rohs-l-6-r-12577270.pdf?src-supplier=Mouser, Construction=Rectangular, Depth=0.5mm, Features="Moisture Resistant", Height=0.016inch, Item Type=Resistor, Lead Free="Lead Free", Length=1mm, Manufacturer Part Number=RC0402FR-07220KL, Military Standard=Not, Number of Terminations=2, Packaging="Tape and Reel", Pricing 1="10000=0.00130 (USD)", Reach SVHC Compliant=Yes, RoHS=Yes, RoHS Compliant=Yes, Series=RC, Size Code=0402, Stock 1=210000, Supplier 1="Arrow Electronics", Supplier Part Number 1=RC0402FR-07220KL, Technology="THICK FILM", Termination=SMD/SMT, Tolerance=1%, Weight=2.3E-05oz, Width=0.02inch
R10: library part 0402WGF5603TCE, "62.5mW Thick Film Resistors 50V ±100ppm/℃ ±1% 560kΩ 0402 Chip Resistor - Surface Mount ROHS", LCSC Part Number=C132339, Manufacturer="UNI-ROYAL(Uniroyal Elec)", Package=0402, ComponentLink1Description=LCSC, ComponentLink1URL=https://www.lcsc.com/product-detail/Chip-Resistor-Surface-Mount_UNI-ROYAL-Uniroyal-Elec-0402WGF5603TCE_C132339.html, Item Type=Resistor, Manufacturer Part Number=0402WGF5603TCE
SW1 SW2: "SWITCH TACTILE SPST-NO 0.05A 12V", Contact Current Rating=50mA, Contact Resistance=100mR, Insulation Resistance=100MR, LCSC Part Number=C231329, Manufacturer=Omron, Max Operating Temperature=70°C, Max Voltage Rating (DC)=12V, Min Operating Temperature=-25°C, Operating Force=1.5N, Package Quantity=1, Ratings="Dust Proof,IP40", Supplier Part Number 1=SW1020DKR-ND, Actuator Length=0.4mm, Actuator Type=Standard, ComponentLink1Description=http://www.farnell.com/datasheets/60838.pdf?src-supplier=Farnell, ComponentLink1URL=http://www.farnell.com/datasheets/60838.pdf?src-supplier=Farnell, ComponentLink2Description=http://www.farnell.com/datasheets/60838.pdf?src-supplier=Element14, ComponentLink2URL=http://www.farnell.com/datasheets/60838.pdf?src-supplier=Element14, ComponentLink3Description=https://omronfs.omron.com/en_US/ecb/products/pdf/en-b3u.pdf?src-supplier=Digi-Key, ComponentLink3URL=https://omronfs.omron.com/en_US/ecb/products/pdf/en-b3u.pdf?src-supplier=Digi-Key, ComponentLink4Description=http://www.omron.com/ecb/products/pdf/en-b3u.pdf?src-supplier=Digi-Key, ComponentLink4URL=http://www.omron.com/ecb/products/pdf/en-b3u.pdf?src-supplier=Digi-Key, ComponentLink5Description=https://www.distrelec.biz/Web/Downloads/he/et/B3U_eng_datasheet.pdf?mime=application%2Fpdf&src-supplier=Distrelec, ComponentLink5URL=https://www.distrelec.biz/Web/Downloads/he/et/B3U_eng_datasheet.pdf?mime=application%2Fpdf&src-supplier=Distrelec, ComponentLink6Description=http://www.onlinecomponents.com/productFiles/mf-OM/en-b3u.pdf?src-supplier=Onlinecomponents.com, ComponentLink6URL=http://www.onlinecomponents.com/productFiles/mf-OM/en-b3u.pdf?src-supplier=Onlinecomponents.com, ComponentLink7Description=https://www.verical.com/server-webapp/html/getDatasheet?partID=552554&src-supplier=Verical, ComponentLink7URL=https://www.verical.com/server-webapp/html/getDatasheet?partID=552554&src-supplier=Verical, ComponentLink8Description=http://www.farnell.com/datasheets/1685550.pdf?src-supplier=Element14, ComponentLink8URL=http://www.farnell.com/datasheets/1685550.pdf?src-supplier=Element14, ComponentLink9Description=http://www.farnell.com/datasheets/2610940.pdf?src-supplier=Farnell, ComponentLink9URL=http://www.farnell.com/datasheets/2610940.pdf?src-supplier=Farnell, ComponentLink10Description=https://www.alliedelec.com/m/d/4c8a9ef82804fc3c241a13c1e298fd73.pdf?src-supplier=Allied+Electronics, ComponentLink10URL=https://www.alliedelec.com/m/d/4c8a9ef82804fc3c241a13c1e298fd73.pdf?src-supplier=Allied+Electronics, Contact Material=Silver, Current Rating=50mA, Depth=2.5mm, Electrical Life=200000Cycles, Height=1.2mm, Illumination Type=Non-Illuminated,Illuminated, Item Type=Switch, Lead Free="Lead Free", Length=4mm, Manufacturer Part Number=B3U-1000P, Max Current Rating=50mA, Mechanical Life=200000Cycles, Mount="Surface Mount", Orientation=Straight, Packaging="Tape and Reel", Pricing 1="1=1, 10=0.961, 25=0.9064, 50=0.7976, 100=0.7251, 250=0.68888, 500=0.67074, 1000=0.52571 (USD)", REACH SVHC=Unknown, Stock 1=116454, Supplier 1=Digi-Key, Switch Function=Off-Mom, Switch Travel=0.15mm, Termination=SMD/SMT, Throw Configuration=SPST, Voltage Rating (DC)=12V, Weight=0.000776oz, Width=3mm
SW3: "3A Direct Insert Single Pole Double Throw (SPDT) 125V Black 10,000 times Plugin Slide Switches ROHS", LCSC Part Number=C319011, Manufacturer="XKB Connectivity", Package=Plugin, ComponentLink1Description=LCSC, ComponentLink1URL=https://www.lcsc.com/product-detail/Slide-Switches_XKB-Connection-SS-12D10L9_C319011.html, Item Type=Switch
TP1: "Wire Connecting Pad", Item Type="Test Point", Manufacturer Part Number="2 Test Pad"
TP2 TP3: "Test Point ON", Item Type="Test Point", Manufacturer Part Number="TEST POINT 0.5mm Dia"
U1: "RF TXRX MOD BT WIFI PCB TH SMD", Clock Frequency=2.484GHz, LCSC Part Number=C2934560, Manufacturer="Espressif Systems", Max Operating Temperature=85°C, Max Supply Voltage=3.6V, Min Operating Temperature=-40°C, Min Supply Voltage=3V, Bandwidth=72MHz, ComponentLink1Description=https://datasheet.octopart.com/ESP32-C3-WROOM-02-N4-Espressif-Systems-datasheet-165560559.pdf?src-supplier=TME, ComponentLink1URL=https://datasheet.octopart.com/ESP32-C3-WROOM-02-N4-Espressif-Systems-datasheet-165560559.pdf?src-supplier=TME, Data Rate=150Mbps, Height=3.35mm, Interface=39,40,224,1514,1518,1532Interface, Item Type=Module, Manufacturer Part Number=ESP32-C3-WROOM-02-N4, Number of GPIO=15NUMBER, Pricing="1=3.28, 10=2.836, 25=2.6796, 100=2.4652, 250=2.33652 (USD)", RoHS=No, Supplier=Digikey
U2: "IC REG BOOST ADJ 3A SOT563", LCSC Part Number=C919459, Manufacturer="Texas Instruments", ComponentLink1Description=http://www.ti.com/general/docs/suppproductinfo.tsp?distId=10&amp;gotoUrl=http%3A%2F%2Fwww.ti.com%2Flit%2Fgpn%2Ftps61023&src-supplier=Digikey, ComponentLink1URL=http://www.ti.com/general/docs/suppproductinfo.tsp?distId=10&amp;gotoUrl=http%3A%2F%2Fwww.ti.com%2Flit%2Fgpn%2Ftps61023&src-supplier=Digikey, Item Type=IC, Manufacturer Part Number=TPS61023DRLR, Pricing="1=0.89, 10=0.637, 50=0.574, 100=0.505, 1000=0.436, 10000=0.41 (USD)", RoHS=Yes, Stock=12004, Supplier=Mouser
U3: "6 1uA 3V~15V SOP-14 Inverters ROHS", LCSC Part Number=C3041279, Manufacturer="Slkor(SLKORMICRO Elec.)", Package=SOP-14, ComponentLink1Description=LCSC, ComponentLink1URL=https://www.lcsc.com/product-detail/Inverters_Slkor-SLKORMICRO-Elec-CD4069_C3041279.html?s_z=n_cd4069, Item Type=Inverter, Manufacturer Part Number=CD4069
X1: "32.768kHz Surface Mount Crystal 12.5pF ±20ppm SMD3215-2P Crystals ROHS", LCSC Part Number=C32346, Manufacturer=Epson, ComponentLink1Description=https://datasheet.octopart.com/Q13FC13500004-Epson-datasheet-62043850.pdf?src-supplier=Farnell, ComponentLink1URL=https://datasheet.octopart.com/Q13FC13500004-Epson-datasheet-62043850.pdf?src-supplier=Farnell, ComponentLink2Description=https://datasheet.octopart.com/Q13FC13500004-Epson-datasheet-32025749.pdf?src-supplier=Newark, ComponentLink2URL=https://datasheet.octopart.com/Q13FC13500004-Epson-datasheet-32025749.pdf?src-supplier=Newark, Item Type=Crystals, Manufacturer Part Number=Q13FC13500004, Reach SVHC Compliant=4187SVHC, RoHS=Yes, Stock=52665, Supplier=Farnell

## Via types
v1: diameter 23.62, hole 11.81, Top Layer to Bottom Layer, tented both sides, 51 vias

## Nets (pads, with @x,y where several pads share a name; then routed paths per layer and width w, separated by ;. In a path a pad name is that pad's centre, name@x,y a point inside that pad or via, vN(x,y) a via of type N, cw(c..) or ccw(c..) an arc to the next point about the centre after c; other vN are vias at no path point)
3V: C4.2 C5.2 L1.1 R2.2 SW3.3 U2.2 U2.3 | length 406.2
  Top Layer w15: R2.2 2293.5,590.23 v1(2294,589.73)
  Bottom Layer w15: 2294,271.73 v1(2294,589.73)
  other v1: 2322,269 2322,317 2322,365
3V3: C1.2 C2.2 C6.2 C7.2 C8.2 C13.1 C14.1 C16.1 C17.1 J1.1 R1.2 R3.2 R4.2 R5.2 R8.2 TP2.1 U1.1 U2.6 U3.14 | length 1898.5
  Top Layer w12: v1(2226,80.73) 2227,81.73 R3.2 ; v1(3150.5,673.23) R4.2
  Top Layer w15: v1(190,751) U3.14 ; R8.2 791.73,466.73 813,488 v1(813,769) ; TP2.1 1858.27,33 v1(1909,83.73) ; v1(2293,761.73) 2293.5,762.23 R1.2 ; R5.2 v1(2331,559.73) ; v1(3009,71.73) 3009.43,72.16 J1.1@3009.43,146.44
  Bottom Layer w15: v1(190,751) 190,792 219.23,821.23 765.77,821.23 768,819 ; v1(2331,559.73) 2471,559.73 2487,575.73 2487,846.73 2491,850.73
  other v1: 1957,83.73 2005,83.73 2257,849.73 2257,880.73
3V#: C15.1 J2.1 SW3.2
  other v1: 1012,156 1012,196 1012,236 2500,328 2548,328
ESP-EN: C3.2 J1.6 R1.1 SW1.1 U1.2 | length 3726.2
  Top Layer w15: v1(920,645) 981.73,706.73 v1(1467.07,706.73) ; v1(1468,65) SW1.1 ; SW1.1@1468,114.23 C3.2 ; R1.1 2344.23,797.46 v1(2356,797.46) U1.2 2455.27,797.46 2812.57,440.16 J1.6@2812.57,146.44
  Bottom Layer w15: v1(920,645) 920,72 966,26 1429,26 v1(1468,65) ; v1(1467.07,706.73) 2338,706.73 2356,724.73 v1(2356,797.46)
GND: C1.1 C2.1 C3.1 C4.1 C5.1 C6.1 C7.1 C8.1 C9.2 C11.1 C12.1 C13.2 C14.2 C15.2 C16.2 C17.2 D2.1 J1.2 J1.MP1 J1.MP2 J2.4 Q1.2 R6.1 SW1.2 SW2.2 TP3.1 U1.9 U1.19 U1.20 U1.21 U1.22 U1.23 U1.24 U1.25 U1.26 U1.27 U1.28 U1.29 U1.30 U1.31 U1.32 U1.33 U1.34 U1.35 U1.36 U1.37 U1.38 U1.39 U2.4 U3.7 | length 854.2
  Top Layer w12: D2.1 v1(60,736.73) ; v1(106,747.73) C8.1 ; v1(1840,733.04) 1899.83,733.04 C17.2 1922.17,733.04 v1(1982,733.04) ; C7.1 v1(2042.5,246.73) ; C6.1 v1(2092.5,246.73) ; v1(2118,733.04) 2177.69,733.04 2186,724.73 2194.31,733.04 v1@2259,733.04 ; v1(2176,221.73) 2176.38,221.35 U2.4 ; v1(2260,733.04) v1@2259,733.04 ; v1(2272,81.73) R6.1 ; C5.1 C4.1 2321,89.73 v1@2322,88.73 ; C2.1 C1.1 2259,792.73 v1@2259,733.04 ; v1(2970,106.73) 2970,145.44 2969,146.44 J1.2@2970.06,146.44 ; v1(3237,692.23) C12.1 ; v1(3237,790.23) C11.1
  Top Layer w15: C9.2@745,589 v1(745,635.73)
  other v1: 2397,81 2445,81 2322,93.73 1900.07,352.73 1948.07,352.73 1996.07,352.73
GPIO2: R4.1 U1.16 | length 101.3
  Top Layer w12: U1.16 3101.32,738.41 3129.5,710.23 R4.1
GPIO5: C9.1 Q1.3 R8.1 U1.4 | length 2299.6
  Top Layer w15: Q1.3 R8.1 ; C9.1 611,571.8 R8.1 ; v1(714,403.73) 625,403.73 611,417.73 611,447.73 611,450.73 R8.1 ; U1.4 2453.62,679.35 v1(2454,679.73)
  Bottom Layer w15: v1(714,403.73) 714,550 843.73,679.73 v1(2454,679.73)
GPIO8: R5.1 U1.7 | length 70.4
  Top Layer w15: R5.1 U1.7
GPIO9: J1.5 SW2.1 U1.8 | length 2857.3
  Top Layer w15: v1(1193,65) SW2.1@1193,111.73 ; v1@2237.4,443.13 U1.8 2720.6,443.13 2769,394.73 2769,127.73 2798,98.73 2845,98.73 2851.94,105.68 J1.5 J1.5@2851.94,146.44
  Bottom Layer w15: v1(1193,65) 996,65 949,112 949,391 1001.73,443.73 v1(2238,443.73)
NetAnt1_1: Ant1.1 R7.1 | length 81
  Top Layer w103.77: 59,975.73 Ant1.1
NetC10_1: C10.1 R9.1 R10.2 | length 535.1
  Top Layer w15: R9.1@394,472.73 516,472.73 552.52,509.25 552.52,870.73
NetC10_2: C10.2 Q1.1 U3.6
NetD1_1: D1.1 D2.2 R7.2
NetD1_2: D1.2 U3.13
NetD3_1: D3.1 R10.1 U3.9 | length 148.5
  Top Layer w15: U3.9@440,773.73 440,841.73 452,853.73 R10.1
NetD3_2: D3.2 U3.10 | length 111.1
  Top Layer w15: D3.2 380,852.73 390,842.73 U3.10@390,773.73
NetJ2_2: J2.2 J2.3
NetL1_2: L1.2 U2.5 | length 160.2
  Top Layer w12: L1.2 2144,303.07 2144,199.73 2153,190.73 U2.5
NetR2_1: R2.1 U1.3 | length 123.3
  Top Layer w15: R2.1 2330.5,724.23 2344.68,738.41 U1.3
NetR3_1: R3.1 R6.2 U2.1
NetR9_2: R9.2 U3.5 U3.8 | length 322.4
  Top Layer w15: R9.2@390,509.73 U3.5 390,627.73 490,727.73 U3.8
NetU3_11: U3.11 U3.12
RXD0: J1.4 U1.11 | length 469.4
  Top Layer w15: J1.4@2891.31,146.44 2891.31,398.05 2936.4,443.13 U1.11
TXD0: J1.3 U1.12 | length 520.2
  Top Layer w15: v1@2927,502.73 v1(2930,502.73) 3089.84,502.73 U1.12 ; v1(2930,209.73) 2930.68,209.05 J1.3@2930.68,146.44
  Bottom Layer w15: v1(2930,209.73) v1(2930,502.73)
USB_D_N: TP1.1 U1.13 | length 668.6